# Allegro board A733_PRO3_AXP318_LPDDR5_FBGA315BALL_32X1_V2_0.brd
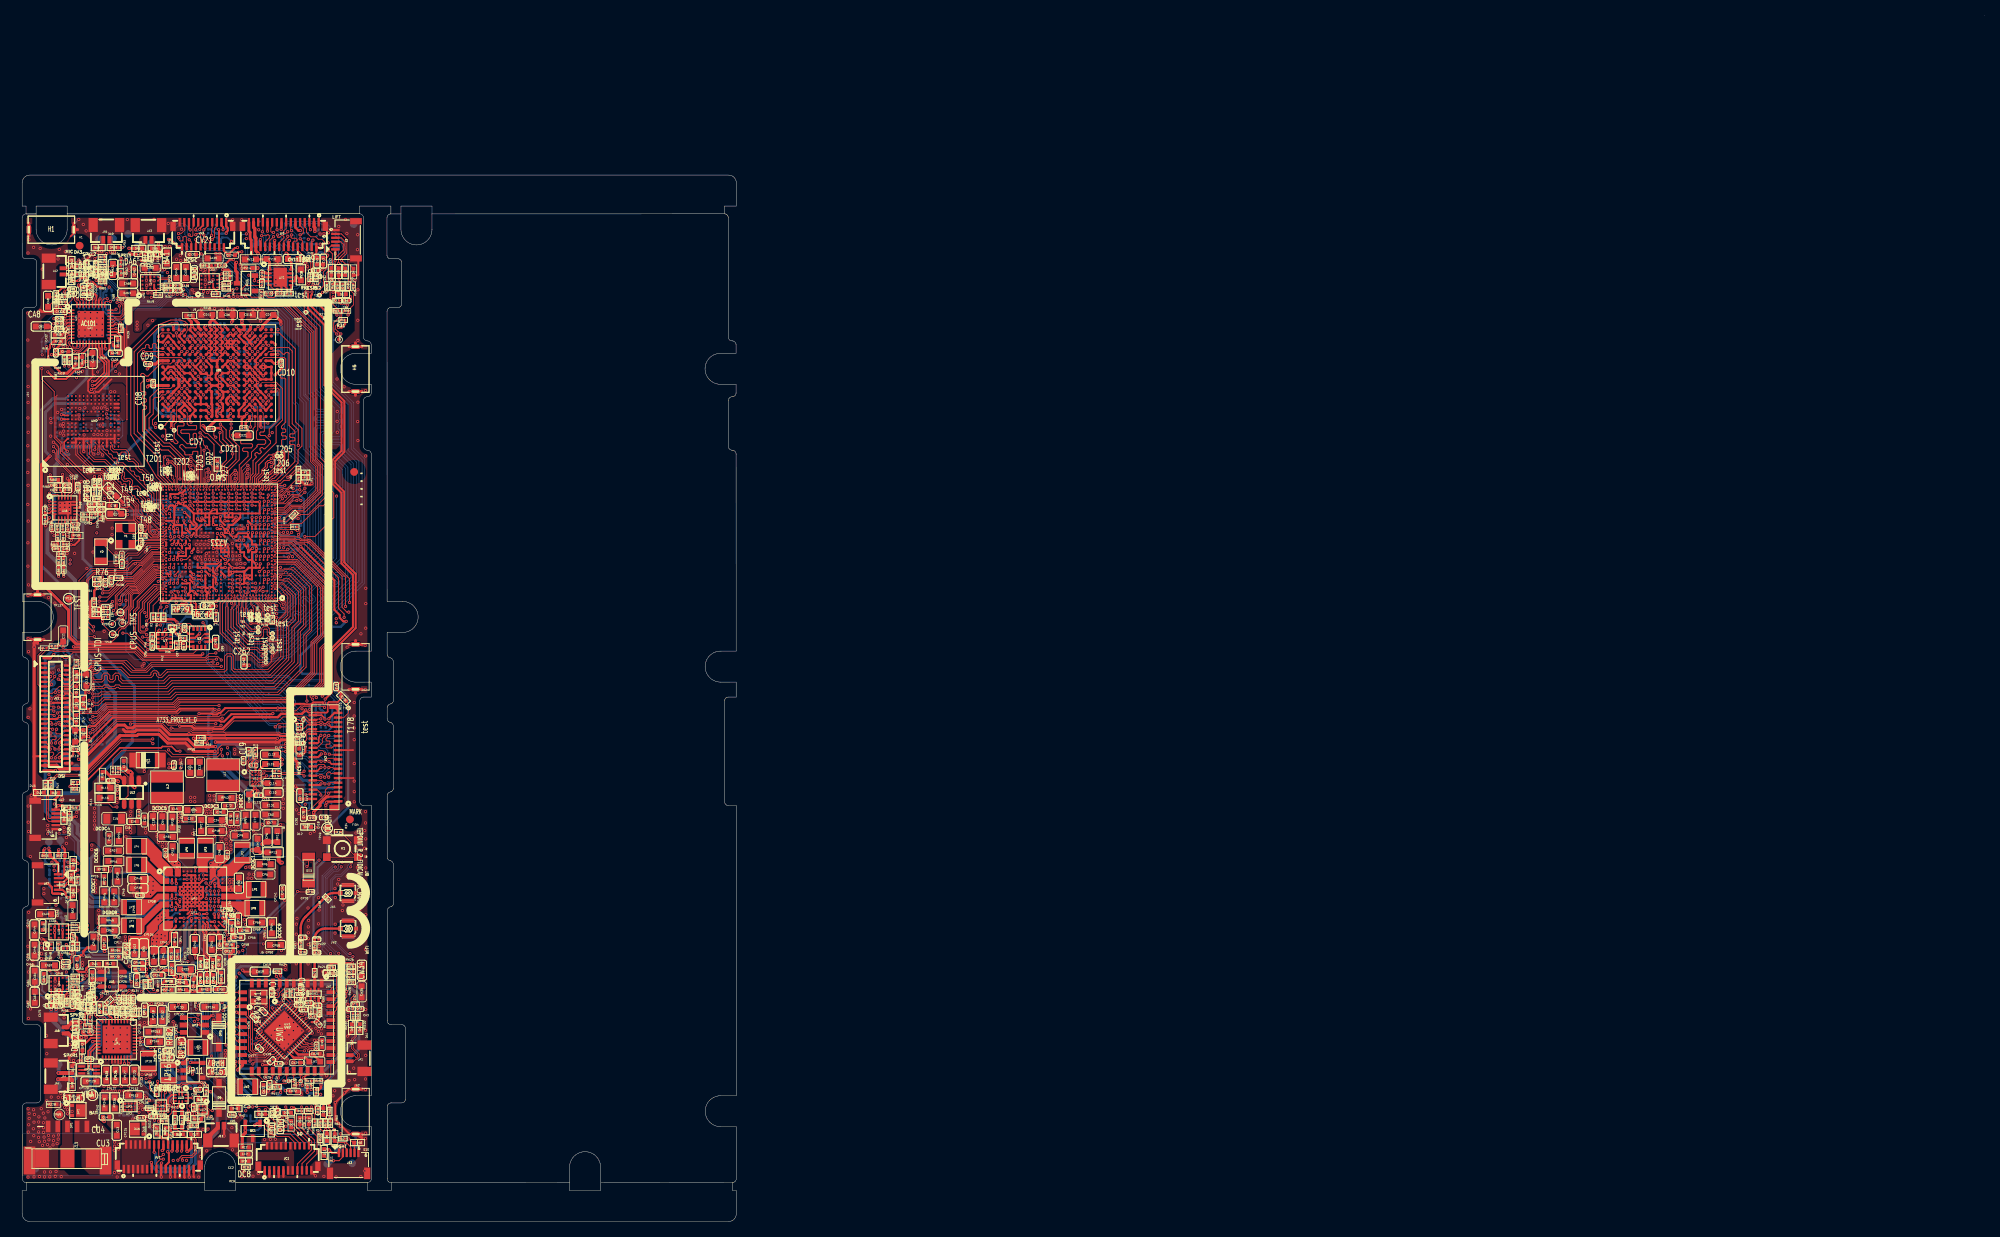
[diagram p0: board, top side]
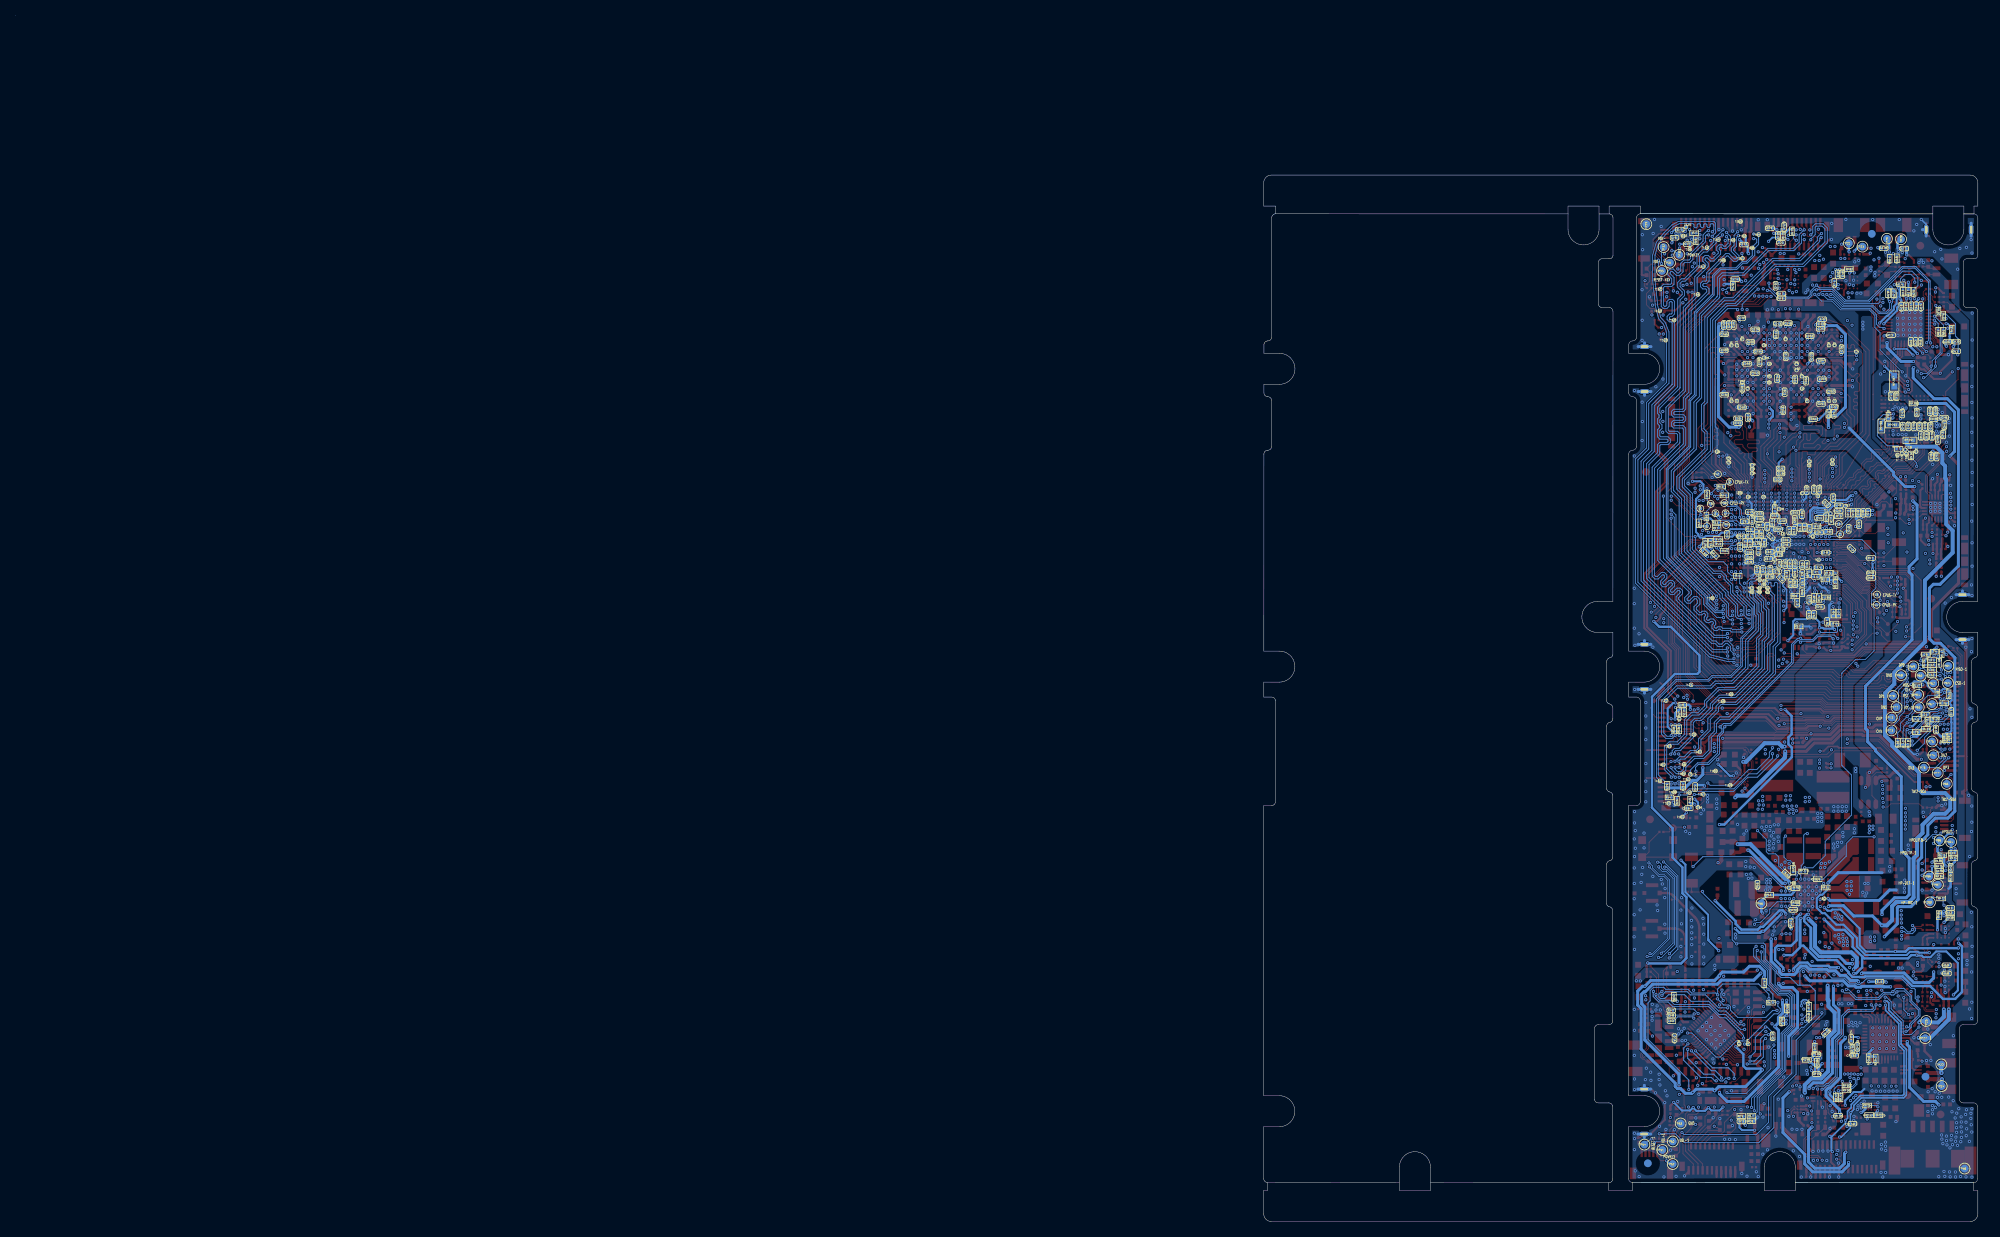
[diagram p1: board, bottom side, seen from below]

Outline 253 x 155.6 mm; copper layers: TOP, L2GND, L3, L4, L5GND, BOTTOM. Coordinates in mm from the lower left corner of the outline.
Outline path: 253,155.6 253,155.59 ; 0,129.5 arc(0.15,129.85) 0.5,130 1.8,130 1.8,128 arc(3.8,126) 5.8,128 5.8,130 43.5,130.01 arc(43.85,129.87) 44,129.51 44.01,114.11 arc(44.15,113.76) 44.51,113.61 arc(44.86,113.47) 45.01,113.11 45.01,112.01 43.01,112.01 arc(41.01,110.01) 43.01,108.01 45.01,108.01 45.01,106.91 arc(44.86,106.56) 44.51,106.41 arc(44.15,106.27) 44.01,105.91 44.01,100.01 arc(44.16,99.66) 44.51,99.51 arc(44.86,99.37) 45.01,99.01 45.02,73.59 43.02,73.59 arc(41.02,71.59) 43.02,69.59 45.02,69.59 45.02,67.66 44.02,67.66 arc(43.67,67.52) 43.52,67.16 43.52,54.16 arc(43.67,53.81) 44.02,53.66 45.02,53.66 45.04,16.34 45.04,16.23 43,16.23 arc(41.03,14.22) 43.02,12.23 45.04,12.23 45.04,5.52 arc(44.89,5.18) 44.55,5.03 44.53,5.03 27.54,5.05 27.54,7.07 arc(25.54,9.01) 23.54,7.07 23.54,7.01 23.54,5.01 0.54,5 arc(0.19,5.15) 0.04,5.5 0.04,14.8 arc(0.18,15.15) 0.54,15.3 1.89,15.3 arc(2.24,15.45) 2.39,15.8 2.38,24.9 arc(2.24,25.25) 1.88,25.4 0.53,25.4 arc(0.18,25.55) 0.03,25.9 0.03,40 arc(0.12,40.37) 0.43,40.6 arc(0.7,40.73) 0.83,41 0.83,46 arc(0.73,46.35) 0.43,46.56 arc(0.15,46.71) 0.03,47 0.02,54.93 arc(0.14,55.25) 0.42,55.42 arc(0.71,55.59) 0.82,55.91 0.82,63.91 arc(0.71,64.23) 0.42,64.4 arc(0.13,64.57) 0.02,64.89 0.02,66.29 arc(0.15,66.59) 0.42,66.77 arc(0.69,66.9) 0.82,67.17 0.82,72.17 arc(0.72,72.53) 0.42,72.73 arc(0.14,72.88) 0.02,73.17 0.02,76 2.02,76 arc(4.02,78) 2.02,80 0.02,80 0,117.44 arc(0.13,117.75) 0.4,117.93 1.47,117.93 arc(1.75,118.06) 1.87,118.33 1.87,123.81 arc(1.74,124.08) 1.47,124.21 0.54,124.21 arc(0.17,124.31) 0,124.65 0,129.5

## Design rules (mm)
net group AECR: nets AECRN AECRP
net group DP2: nets MIC1N-MIC MIC1P-MIC
net group DP3: nets MIC2N/MIC3N MIC2P/MIC3P
net group DP4: nets MIC2N/MIC3N-1 MIC2P/MIC3P-1
net group DP5: nets MIC2N/MIC3N-MIC MIC2P/MIC3P-MIC
net group DP6: nets N20760136 N20760138
net group HPOUTL-2: nets HPOUTL-2 SWOUT2
net group HPOUTR-2: nets HPOUTR-2 USB2-SW-EN
net group IIC-TW0: nets TWI0-SCK TWI0-SDA
net group MCSI-IIC: nets TWI3-SCK TWI3-SDA
net group MICIN1: nets MICIN1N MICIN1P
net group PWU-IIC: nets PMU-SCK PMU-SDA
net group SDC0-CLK: nets N22008209 SDC0-CLK
net group SPOL: nets SPOLN SPOLP
net group SPOR: nets SPORN SPORP
net group TW1-IIC: nets TWI1-SCK TWI1-SDA
net group USB1-DM: nets N16846076 USB1-DM
net group USB1-DP: nets N16846079 USB1-DP
net group WCK0-A: nets WCK0N-A WCK0P-A
net group WCK0-B: nets WCK0N-B WCK0P-B
net group WCK1-A: nets WCK1N-A WCK1P-A
net group WCK1-B: nets WCK1N-B WCK1P-B
net group WL-SDIO-CLK: nets N21687669 WL-SDIO-CLK
net group CLS-CLK: nets AP-CK32K-OUT
net group D+: nets D+ N21860949 TYPEC-DP TYPEC-DP-1 USB0-DP USB2-DP
net group D-: nets D- N21860967 TYPEC-DM TYPEC-DM-1 USB0-DM USB2-DM
net group LDO: nets ALDO2 ALDO3 BLDO2 BLDO4 CLDO1 CLDO2

## Placement (name value [footprint] x y rotation side)
BA1  600R@100M  [L0603]  18.66 124.31 90 top
BA2  600R@100M  [L0603]  6.5 40.11 90 top
C1  2.2uF  [C0201]  20.72 83.79 0 bottom
C3  2.2uF  [C0201]  20.89 83.18 0 bottom
C4  470nF  [C0201]  20.47 84.4 0 bottom
C5  100nF  [C0201]  14.14 91.45 270 bottom
C6  100nF  [C0201]  22.63 82.41 90 bottom
C7  100nF  [C0201]  23.29 79.84 90 bottom
C8  NC/100nF  [C0201]  22.63 83.52 270 bottom
C9  100nF  [C0201]  30.07 90.33 0 bottom
C10  100nF  [C0201]  17.93 92.38 180 bottom
C11  10uF  [C0603]  5.29 75.55 90 top
C12  100nF  [C0201]  29.99 87.54 90 bottom
C13  100nF  [C0201]  29.38 87.54 90 bottom
C14  100nF  [C0201]  27.71 84.08 270 bottom
C15  100nF  [C0201]  29.38 88.39 180 bottom
C16  1uF  [C0201]  29.37 89.33 180 bottom
C17  100nF  [C0201]  32.35 88.62 270 bottom
C18  100nF  [C0201]  26.75 84.09 270 bottom
C19  100nF  [C0201]  28.48 84.09 270 bottom
C20  100nF  [C0201]  10.73 82.42 270 top
C21  100nF  [C0201]  15.31 89.96 90 bottom
C22  2.2uF  [C0201]  21.73 80.23 90 bottom
C23  100nF  [C0201]  20.35 79.3 180 bottom
C24  22uF  [C0603]  25.04 51.78 0 top
C25  22uF  [C0603]  22.03 53.07 180 top
C26  10uF  [C0402]  25.56 52.83 0 top
C27  4.7uF  [C0402]  21.53 51.95 180 top
C28  2.2uF  [C0201]  25.71 86.08 0 bottom
C29  2.2uF  [C0201]  25.61 84.86 270 bottom
C30  1uF  [C0201]  24.82 84.81 270 bottom
C31  1uF  [C0201]  24.21 84.81 270 bottom
C32  100nF  [C0201]  23.61 84.81 270 bottom
C33  2.2uF  [C0201]  25.45 86.71 0 bottom
C34  10uF  [C0402]  15.76 51.8 270 top
C35  2.2uF  [C0201]  24.74 87.93 0 bottom
C36  1uF  [C0201]  22.05 84.72 270 bottom
C37  1nF  [C0201]  11.5 82.78 90 top
C38  100nF  [C0201]  14.76 91.44 270 bottom
C39  100nF  [C0201]  20.49 88.91 180 bottom
C40  1uF  [C0201]  16.66 89.37 90 bottom
C41  1uF  [C0201]  21.7 89.39 90 bottom
C42  4.7uF  [C0402]  11.2 49.43 270 top
C43  2.2uF  [C0201]  22.33 89.56 90 bottom
C44  100nF  [C0201]  22.94 89.56 90 bottom
C45  4.7uF  [C0402]  19.83 53.25 0 top
C46  1uF  [C0201]  24.74 87.32 0 bottom
C47  2.2uF  [C0201]  16.31 86.84 45 bottom
C48  1nF  [C0201]  19.61 86.31 0 bottom
C49  100nF  [C0201]  29.41 91.54 180 bottom
C50  1uF  [C0201]  15.4 91.45 270 bottom
C51  100nF  [C0201]  9.61 82.22 0 top
C52  100nF  [C0201]  24.32 89.14 90 bottom
C53  2.2uF  [C0201]  23.71 89.14 90 bottom
C54  22uF  [C0603]  18.09 51.58 270 top
C55  2.2uF  [C0201]  22.66 84.71 270 bottom
C56  10uF  [C0603]  29.24 54.39 90 top
C57  4.7uF  [C0402]  32.09 51.46 0 top
C58  2.2uF  [C0201]  27.91 88.68 90 bottom
C59  1uF  [C0201]  29.47 85.14 0 bottom
C60  100nF  [C0201]  29.47 85.75 0 bottom
C61  18pF-C0G  [C0201]  15.28 87.59 270 top
C62  22pF-C0G  [C0201]  12.85 85.95 90 top
C63  22uF  [C0603]  32.05 52.51 0 top
C64  10uF  [C0402]  27.71 51.99 270 top
C65  2.2uF  [C0201]  26.82 86.41 180 bottom
C66  1uF  [C0201]  29.47 86.36 0 bottom
C67  100nF  [C0201]  26.99 85.48 180 bottom
C68  1uF  [C0201]  27.56 87.58 90 bottom
C69  18pF-C0G  [C0201]  15.28 89.41 90 top
C70  22pF-C0G  [C0201]  12.85 84.82 270 top
C71  10uF  [C0603]  30.08 51.78 270 top
C72  10uF  [C0402]  26.58 53.64 180 top
C73  4.7uF  [C0402]  26.89 52 270 top
C74  1uF  [C0201]  26.67 88.35 225 bottom
C75  100nF  [C0201]  28.52 88.68 90 bottom
C76  100nF  [C0201]  25.89 83.87 0 bottom
C77  22uF  [C0603]  12.07 91.31 180 top
C78  10uF  [C0402]  11.68 92.35 180 top
C79  1uF  [C0201]  27.15 89.66 90 bottom
C80  1uF  [C0201]  23.6 90.5 270 bottom
C81  100nF  [C0201]  22.69 91.26 90 bottom
C82  100nF  [C0201]  28.05 89.86 180 bottom
C83  2.2uF  [C0201]  25.76 89.3 0 bottom
C84  NC  [C0201]  10.75 79.27 180 top
C85  NC  [C0201]  9.55 78.97 0 top
C86  1nF  [C0201]  41.84 118.81 0 top
C87  10nF  [C0201]  20.87 74.29 90 top
C88  100nF  [C0201]  20.93 76.58 90 top
C89  2.2uF  [C0402]  24.95 74.75 270 top
C92  1uF  [C0201]  21.13 78.28 90 bottom
C93  100nF  [C0201]  21.79 78.28 90 bottom
C95  47pF  [C0201]  27.03 13.76 180 top
C96  100nF  [C0201]  16.79 74.26 90 top
C97  100nF  [C0201]  19.43 77.38 90 bottom
C108  NC/100nF  [C0201]  23.54 82.35 270 bottom
C109  100nF  [C0201]  23.6 83.69 90 bottom
C110  1nF  [C0201]  38.12 14.35 90 top
C111  NC/1uF  [C0201]  28.28 86.54 90 bottom
C116  NC/1uF  [C0201]  26.84 83.23 0 bottom
C125  NC/100nF  [C0201]  17.93 91.7 180 bottom
C128  NC/100nF  [C0201]  24.15 82.35 270 bottom
C129  NC/100nF  [C0201]  28.53 87.39 0 bottom
C130  22uF  [C0603]  16.87 51.6 270 top
C131  22uF  [C0603]  32.05 53.72 0 top
C132  100nF  [C0201]  30.65 87.02 270 bottom
C133  100nF  [C0201]  29.12 90.54 90 bottom
C134  1uF  [C0201]  19.57 58.9 90 top
C135  1uF  [C0201]  11.44 56.88 180 top
C257  1uF  [C0201]  13.77 85.61 180 bottom
C258  1uF  [C0201]  13.76 83.03 180 bottom
C259  2.2uF  [C0201]  13.76 83.64 0 bottom
C260  100nF  [C0201]  30.49 88.39 0 bottom
C261  4.7uF  [C0402]  23.9 79.44 180 top
C262  10uF  [C0402]  28.6 72.2 90 top
CA1  10uF/2.2uF  [C0603]  2.46 115.48 0 top
CA2  1uF/NC  [C0201]  8.01 113.5 90 bottom
CA3  33pF  [C0201]  43.51 27.42 180 top
CA4  4.7uF/NC  [C0402]  5.55 112.24 0 top
CA5  1uF  [C0201]  7.95 118.09 90 bottom
CA6  100nF/1uF  [C0201]  6.44 120.3 180 top
CA7  10pF  [C0201]  42.95 28.04 180 top
CA8  10uF/NC  [C0603]  3.34 118.73 270 top
CA9  100nF/1uF  [C0201]  6.44 119.69 180 top
CA10  2.2uF/1uF  [C0201]  8.65 113.52 90 bottom
CA11  2.2uF/NC  [C0201]  9.25 118.07 270 bottom
CA12  33pF  [C0201]  42.4 27.42 180 top
CA13  NC/2.2uF  [C0201]  11.19 114.36 180 bottom
CA14  1uF/0.47uF  [C0201]  4.34 112.09 270 top
CA15  1uF/NC  [C0201]  7.33 118.11 90 bottom
CA16  33pF  [C0201]  8.24 123.47 270 top
CA17  1uF/0.1uF  [C0201]  8.59 118.09 270 bottom
CA18  1uF  [C0201]  9.87 118.07 90 bottom
CA19  100nF/1uF  [C0201]  9.47 123.43 270 top
CA20  10pF  [C0201]  8.86 122.64 270 top
CA21  10uF  [C0603]  11.7 122.86 270 top
CA22  100nF/1uF  [C0201]  9.47 122.32 90 top
CA23  2.2uF  [C0402]  8.76 120.15 90 top
CA24  33pF  [C0201]  8.24 121.96 270 top
CA25  10uF  [C0603]  9.08 111.35 270 top
CA26  2.2uF  [C0402]  12.01 112.03 180 top
CA27  2.2uF  [C0402]  4.9 117.41 180 top
CA28  100nF/1uF  [C0201]  4.81 116.49 180 top
CA29  100nF  [C0201]  4.99 45.22 0 bottom
CA30  33pF  [C0201]  2.78 113.52 0 bottom
CA31  100nF  [C0201]  3.5 45.63 270 bottom
CA32  100nF/1uF  [C0201]  4.8 115.85 180 top
CA33  NC/33pF  [C0201]  3.89 113.52 0 bottom
CA34  NC/33pF  [C0201]  2.79 112.28 0 bottom
CA35  22uF  [C0603]  24.62 124.27 180 top
CA36  100nF  [C0201]  25.79 123.35 0 top
CA37  NC/100nF  [C0201]  24.67 123.35 180 top
CA38  4.7uF-10V  [C0402]  22.21 122.41 90 top
CA39  10uF-25V  [C0603]  21.11 122.44 270 top
CA40  22uF  [C0603]  3.02 39.65 180 top
CA41  100nF  [C0201]  3.54 40.46 180 bottom
CA42  NC/100nF  [C0201]  3.54 39.85 180 bottom
CA43  4.7uF-10V  [C0402]  2.66 38.05 270 top
CA44  10uF-25V  [C0603]  1.59 37.63 90 top
CA45  10uF-25V  [C0603]  19.88 122.44 270 top
CA46  10uF-25V  [C0603]  1.59 35.01 90 top
CA47  330nF  [C0201]  25.32 119.72 180 bottom
CA48  330nF  [C0201]  5.64 32.88 180 top
CA49  330nF  [C0201]  25.32 119.11 180 bottom
CA50  330nF  [C0201]  5.64 33.49 180 top
CA51  NC/220pF  [C0201]  26.08 120.72 90 bottom
CA52  NC/220pF  [C0201]  6.54 36.71 90 top
CA53  NC/100pF  [C0201]  14.98 124.8 180 top
CA54  NC/100pF  [C0201]  17.47 124.77 0 top
CA55  NC/100pF  [C0201]  3.07 35.51 90 top
CA56  NC/100pF  [C0201]  5.57 35.24 0 top
CA57  22uF  [C0603]  3.53 33.04 180 top
CA58  100nF  [C0201]  3.98 32 180 bottom
CA59  NC/100nF  [C0201]  4 33.06 180 bottom
CA60  22uF  [C0603]  16.51 123.05 180 top
CA61  100nF  [C0201]  18.08 122.23 270 bottom
CA62  4.7uF-10V  [C0402]  14.46 122.53 270 top
CA63  10uF-25V  [C0603]  13.63 119.76 180 top
CA64  10uF-25V  [C0603]  1.62 31.65 90 top
CA65  NC/100nF  [C0201]  17.48 122.23 270 bottom
CA66  4.7uF-10V  [C0402]  2.8 31.53 90 top
CA67  10uF-25V  [C0603]  1.62 28.93 90 top
CA68  10uF-25V  [C0603]  13.6 121.03 0 top
CA69  330nF  [C0201]  7.16 28.05 270 top
CA70  330nF  [C0201]  20.06 120.76 0 top
CA71  330nF  [C0201]  6.51 28.05 270 top
CA72  330nF  [C0201]  20.06 120.13 0 top
CA73  NC/220pF  [C0201]  6.82 30.23 0 top
CA74  NC/220pF  [C0201]  18.51 121.12 90 bottom
CA75  NC/100pF  [C0201]  3.5 27.84 180 top
CA76  NC/100pF  [C0201]  4.64 27.84 0 top
CA77  NC/100pF  [C0201]  9.48 125.53 180 bottom
CA78  NC/100pF  [C0201]  12.14 125.56 0 bottom
CA79  1uF  [C0201]  4.65 94.37 180 top
CA80  100nF  [C0201]  4.65 94.98 180 top
CA81  1uF  [C0201]  6.82 89.26 0 top
CA82  100nF  [C0201]  5.8 94.98 0 top
CA83  10nF  [C0201]  5.54 86.76 180 top
CA84  470nF  [C0201]  5.28 88.35 90 top
CA85  1uF  [C0201]  5.36 84.1 90 top
CA86  NC  [C0201]  4.99 86.13 180 top
CA87  470nF  [C0201]  4.59 88.36 90 top
CA88  1uF  [C0201]  4.7 84.08 90 top
CA89  10nF  [C0201]  4.43 86.76 180 top
CA90  100nF  [C0201]  2.93 91.74 90 top
CA91  NC/1uF  [C0201]  3.86 89.56 270 top
CA92  NC/1uF  [C0201]  7.16 94.83 90 top
CA93  10nF  [C0201]  10.22 91.86 180 top
CA94  470nF  [C0201]  10.08 90.96 270 top
CA95  1uF  [C0201]  9.96 95.3 270 top
CA96  NC  [C0201]  9.61 93.21 180 top
CA97  470nF  [C0201]  9.21 91.21 180 top
CA98  1uF  [C0201]  9.31 95.31 270 top
CA99  10nF  [C0201]  9.01 91.85 180 top
CA100  1uF  [C0201]  5.91 89.53 270 top
CA101  1uF  [C0201]  5.8 94.37 0 top
CA102  100nF  [C0201]  6.82 89.92 0 top
CC1  100nF  [C0201]  30.48 12.91 180 bottom
CC2  10uF  [C0402]  28.77 8.7 180 top
CD1  10uF  [C0603]  31.69 116.98 180 top
CD2  100nF  [C0201]  20.06 116.41 0 bottom
CD3  100nF  [C0201]  30.91 103.02 0 bottom
CD4  100nF  [C0201]  18.59 104.2 90 bottom
CD5  100nF  [C0201]  30.91 103.62 0 bottom
CD6  10uF  [C0603]  26.44 116.99 180 top
CD7  4.7uF  [C0201]  24.33 102.25 0 top
CD8  2.2uF  [C0201]  16.9 108.11 90 top
CD9  100nF  [C0201]  16.23 110.64 180 top
CD10  100nF  [C0201]  33.41 110.73 270 top
CD11  10uF  [C0603]  23.81 117 180 top
CD12  4.7uF  [C0201]  23.55 108.64 90 bottom
CD13  2.2uF  [C0201]  25.8 115.85 0 bottom
CD14  100nF  [C0201]  26.05 114.47 270 bottom
CD15  100nF  [C0201]  24.78 111.63 90 bottom
CD16  10uF  [C0603]  29.05 116.99 0 top
CD17  4.7uF  [C0201]  29.64 103.74 270 bottom
CD18  2.2uF  [C0201]  21.47 111.54 270 bottom
CD19  100nF  [C0201]  28.71 115.1 0 bottom
CD20  100nF  [C0201]  18.58 105.09 180 bottom
CD21  10uF  [C0603]  28.5 101.42 0 top
CD22  4.7uF  [C0201]  25.8 95.74 180 bottom
CD23  2.2uF  [C0201]  28.19 90.63 0 bottom
CD24  100nF  [C0201]  26.54 90.17 270 bottom
CD25  100nF  [C0201]  28.2 91.31 0 bottom
CD26  1uF  [C0201]  26.18 91.93 90 bottom
CD27  100nF  [C0201]  26.17 91.03 0 bottom
CD32  10uF  [C0603]  11.58 94.11 135 top
CD33  4.7uF  [C0201]  21.14 94.41 270 bottom
CD34  2.2uF  [C0201]  25.24 90.37 0 bottom
CD35  100nF  [C0201]  22.07 94.36 270 bottom
CD36  100nF  [C0201]  25.43 96.51 0 bottom
CD37  100nF  [C0201]  19.27 104.2 90 bottom
CD38  100nF  [C0201]  32.73 115.67 270 bottom
CD39  100nF  [C0201]  20.27 115.78 0 bottom
CD40  100nF  [C0201]  32.09 115.67 270 bottom
CD41  100nF  [C0201]  20.27 115.18 0 bottom
CD42  100nF  [C0201]  31.48 115.67 270 bottom
CD43  100nF  [C0201]  28.73 109.44 0 bottom
CD44  100nF  [C0201]  20.24 111.05 180 bottom
CD45  100nF  [C0201]  20.1 108.68 180 bottom
CD46  100nF  [C0201]  25.08 104.69 90 bottom
CD47  100nF  [C0201]  25.89 108.77 90 bottom
CD48  100nF  [C0201]  24.49 115.92 0 bottom
CD49  100nF  [C0201]  28.57 102.41 0 top
CD50  100nF  [C0201]  29.33 113.5 0 bottom
CD51  100nF  [C0201]  20.22 105.48 0 bottom
CD52  100nF  [C0201]  30.42 105.04 180 bottom
CD53  100nF  [C0201]  21.67 114.24 0 bottom
CD54  100nF  [C0201]  28.34 112.25 180 bottom
CD55  1uF  [C0201]  23.56 91.45 180 bottom
CD56  1uF  [C0201]  20.43 94.41 270 bottom
CD57  1uF  [C0201]  25.43 97.16 0 bottom
CD58  2.2uF  [C0201]  30.36 107.57 90 bottom
CD59  1uF  [C0201]  30.48 116.58 0 bottom
CD60  1uF  [C0201]  32.75 112.39 0 bottom
CD61  1uF  [C0201]  32.7 106.67 0 bottom
CD62  1uF  [C0201]  17.57 112.55 270 bottom
CD63  2.2uF  [C0201]  18.93 107.1 0 bottom
CD64  100nF  [C0201]  21.25 103.52 180 bottom
CD65  100nF  [C0201]  32.71 114.47 0 bottom
CD66  1uF  [C0201]  22.14 108.49 270 bottom
CD67  1uF  [C0201]  24.91 107.01 270 bottom
CD68  1uF  [C0201]  28.15 110.9 270 bottom
CD69  1uF  [C0201]  29.76 110.66 0 bottom
CL1  1nF  [C0201]  15.03 52.6 90 top
CL3  10uF  [C0603]  22.91 58.61 270 top
CL4  10uF  [C0603]  21.67 58.6 270 top
CL5  4.7uF-50V  [C0805]  11.87 51.97 0 top
CL6  100nF-50V  [C0402]  14.42 51.62 180 top
CL7  100nF-50V  [C0402]  13.11 59.02 90 top
CL9  100nF  [C0201]  28.54 59.46 270 top
CL10  10uF-10V  [C0603]  32.35 55.33 180 top
CL11  100nF-10V  [C0201]  30.47 54.99 0 top
CL12  10uF-10V  [C0603]  32.04 60.24 180 top
CL13  100nF-10V  [C0201]  29.84 58.84 0 top
CL14  10uF-10V  [C0603]  32.33 56.55 0 top
CL15  4.7uF-10V  [C0603]  32.04 59.03 0 top
CL16  NC  [C0201]  5.4 63.47 270 bottom
CL17  100nF  [C0201]  3.42 65.76 270 bottom
CL18  10uF  [C0603]  8.28 69.86 270 top
CL19  100nF  [C0201]  6.84 60.95 0 top
CL20  10uF  [C0603]  6.84 62.62 270 top
CM1  100nF  [C0201]  18.66 93.34 90 bottom
CM2  4.7uF  [C0201]  19.53 92.63 45 bottom
CM3  100nF  [C0201]  19.56 90.87 270 bottom
CM4  4.7uF  [C0201]  20.47 90.78 180 bottom
CM24  2.2uF  [C0201]  7.35 101.36 90 bottom
CM25  1uF  [C0201]  9.74 104.24 90 bottom
CM26  4.7uF  [C0201]  10.48 106.48 270 bottom
CM27  4.7uF  [C0201]  11.2 106.46 270 bottom
CM28  100nF  [C0201]  7.88 104.38 90 bottom
CM29  4.7uF  [C0201]  5.92 101.36 90 bottom
CM30  100nF  [C0201]  4.47 101.55 270 bottom
CM31  100nF  [C0201]  6.63 101.36 90 bottom
CM32  4.7uF  [C0201]  8.95 102.57 270 bottom
CM33  100nF  [C0201]  6.81 102.57 270 bottom
CM34  100nF  [C0201]  7.52 102.57 270 bottom
CM35  2.2uF  [C0201]  6.18 104.54 90 bottom
CM37  2.2uF  [C0201]  5.31 98.69 270 bottom
CM39  2.2uF  [C0201]  5.7 103.52 0 bottom
CM54  4.7uF  [C0201]  9.68 102.57 270 bottom
CM55  2.2uF  [C0201]  6.1 102.56 270 bottom
CM56  1uF  [C0201]  8.23 102.57 270 bottom
CM57  4.7uF  [C0201]  4.31 102.75 90 bottom
CM58  1uF  [C0201]  5.15 100.83 270 bottom
CM59  100nF  [C0201]  5.46 104.54 90 bottom
CM60  100nF  [C0201]  6.02 98.68 270 bottom
CM61  100nF  [C0201]  4.35 103.71 180 bottom
CP1  10uF  [C0603]  15.69 35.19 90 top
CP2  4.7uF  [C0402]  27.87 38.89 90 top
CP3  22uF  [C0603]  27.95 43.66 90 top
CP4  10uF  [C0603]  16.98 34.22 90 top
CP5  22uF  [C0603]  31.3 44.78 0 top
CP6  10uF  [C0603]  31.62 49.71 270 top
CP7  10uF  [C0603]  30.36 48.67 270 top
CP8  22uF  [C0603]  25.46 47.61 90 top
CP9  22uF  [C0603]  28.12 49.81 0 top
CP10  100nF  [C0201]  37.17 42.52 180 top
CP11  10uF  [C0603]  9.19 36.05 270 top
CP12  4.7uF  [C0402]  7.07 33.42 90 top
CP13  4.7uF  [C0402]  19.22 34.46 90 top
CP15  1uF  [C0201]  26.44 47.32 90 top
CP17  4.7uF  [C0402]  10.58 35.97 270 top
CP18  22uF  [C0603]  25.03 50.39 180 top
CP20  1uF  [C0201]  23.81 40.21 0 bottom
CP21  1uF  [C0201]  24.12 38.5 90 bottom
CP22  10uF  [C0603]  21.05 32.54 0 top
CP23  22uF  [C0603]  19.41 47.71 90 top
CP24  4.7uF  [C0402]  17.51 31.78 0 top
CP25  4.7uF  [C0402]  14.77 31.07 90 top
CP27  22uF  [C0603]  11.77 47.84 0 top
CP28  4.7uF  [C0402]  25.38 33.51 90 top
CP29  4.7uF  [C0402]  22.99 31.34 90 top
CP30  1uF  [C0201]  18.47 47.57 90 top
CP31  10uF  [C0603]  24.44 35.76 90 top
CP32  4.7uF  [C0402]  26.77 34.88 0 top
CP33  4.7uF  [C0402]  23.83 31.34 90 top
CP34  22uF  [C0603]  18.72 49.63 0 top
CP35  4.7uF  [C0402]  24.65 31.34 90 top
CP37  4.7uF  [C0402]  25.54 29.93 180 top
CP38  22uF  [C0603]  14.93 42.99 180 top
CP39  22uF  [C0603]  12.29 44.56 90 top
CP40  10uF  [C0603]  22.26 35.74 90 top
CP41  10uF  [C0603]  18.21 34.21 90 top
CP43  1uF  [C0201]  15.17 42.06 180 top
CP44  4.7uF  [C0402]  20.03 34.46 90 top
CP46  4.7uF  [C0402]  15.03 33.4 0 top
CP47  22uF  [C0603]  11.88 41.9 270 top
CP48  NC  [C0402]  22.1 30.78 90 top
CP49  NC/10uF  [C0603]  14.92 44.19 180 top
CP50  10uF  [C0603]  32.66 35.68 180 top
CP51  NC  [C0402]  25.47 36.16 90 top
CP52  22uF  [C0603]  11.21 37.54 0 top
CP55  4.7uF  [C0402]  28.65 37.59 180 top
CP56  1uF  [C0201]  28.42 43.46 90 bottom
CP58  4.7uF  [C0402]  27.81 36.69 180 top
CP59  22uF  [C0603]  30.23 38.59 0 top
CP103  10uF  [C0603]  14.49 35.2 90 top
CP112  10uF  [C0603]  14.36 16.27 0 top
CP115  100nF  [C0201]  15.34 13.38 0 top
CP116  100nF  [C0201]  8.56 27.73 270 top
CP117  1uF-15V  [C0402]  15.81 27.29 270 top
CP118  10uF-15V  [C0603]  16.86 26.57 270 top
CP119  10uF  [C0603]  6.67 16.04 180 top
CP120  10uF  [C0603]  8.88 18.06 180 top
CP121  1uF  [C0201]  8.65 20.94 0 top
CP122  10uF  [C0603]  10.83 18.87 270 top
CP123  NC/22uF  [C0603]  14.46 18.88 90 top
CP124  4.7uF  [C0201]  16.33 23.56 90 bottom
CP125  47nF-25V  [C0201]  15.54 22.54 90 bottom
CP126  22uF  [C0603]  12.04 18.87 90 top
CP127  NC/22uF  [C0603]  13.25 18.88 90 top
CP129  4.7uF  [C0402]  8.24 24.43 0 top
CP130  NC/100pF  [C0201]  15.93 21.41 180 bottom
CP132  NC/10uF-15V  [C0603]  18.07 26.58 270 top
CP133  NC/10uF-15V  [C0603]  20.15 27.68 180 top
CP134  22uF  [C0603]  24.21 27.7 0 top
CP135  100nF  [C0201]  18.01 13.65 180 bottom
CP136  22uF  [C0603]  20.44 22.43 270 top
CP137  1uF  [C0201]  10.8 27.28 270 top
CP138  330pF  [C0201]  16.86 13.56 0 top
CP139  330pF  [C0201]  16.16 12.63 0 bottom
CP140  4.7uF  [C0402]  20.71 30.8 180 top
CP141  4.7uF  [C0402]  33.56 42.52 270 top
CP142  1uF  [C0201]  15.07 26.98 90 top
CP143  1uF  [C0201]  14.46 26.99 90 top
CP144  22uF  [C0603]  17.09 23.19 180 top
CP150  NC/100nF  [C0201]  20.79 21.57 0 bottom
CP151  10uF  [C0603]  25.08 19.27 0 top
CP152  22pF  [C0201]  20.81 19.02 180 bottom
CP153  10uF  [C0402]  18.71 21.23 180 top
CP154  2.2uF  [C0201]  18.71 22.04 180 top
CU1  1uF  [C0201]  12.66 30.95 180 bottom
CU2  4.7uF  [C0402]  9.03 31.75 90 top
CU3  10uF-16V  [C0603]  12.2 11.77 270 top
CU4  1uF  [C0402]  10.83 13.5 180 top
CU5  100nF  [C0201]  22.69 17 180 top
CU6  100nF  [C0201]  22.14 14.71 90 top
CV1  NC  [C0201]  37.85 122.69 0 top
CV2  NC  [C0402]  38.82 123.91 270 top
CV3  NC  [C0201]  36.46 56.07 90 bottom
CV4  2.2uF  [C0201]  37.4 126.1 0 bottom
CV5  4.7uF  [C0402]  38.01 123.9 270 top
CV6  1uF  [C0201]  39.11 126.93 0 bottom
CV7  1uF  [C0201]  38.44 127.98 0 bottom
CV8  1uF  [C0201]  38.11 66.66 180 bottom
CV9  100nF  [C0201]  40.47 69.02 270 top
CV10  10uF  [C0603]  32.23 124.18 0 top
CV11  4.7uF-16V  [C0603]  34.98 124.19 0 top
CV12  1uF  [C0201]  30.91 122.2 270 top
CV13  100nF  [C0201]  30.17 126.05 0 bottom
CV14  NC/1uF  [C0201]  31.29 121.58 0 bottom
CV15  100nF  [C0201]  31.76 119.73 0 top
CV16  2.2uF  [C0201]  37.27 53.33 0 bottom
CV17  4.7uF  [C0402]  35.81 54.94 90 top
CV18  1uF  [C0201]  38.87 52.13 180 top
CV19  1uF  [C0201]  37.35 52.06 180 top
CV20  NC  [C0402]  36.29 52.55 270 top
CV21  NC  [C0402]  21.99 124.76 180 top
CV22  NC  [C0201]  25.38 126.28 0 bottom
CV23  2.2uF  [C0201]  24.97 128.33 90 bottom
CV24  4.7uF  [C0402]  27.02 124.67 0 top
CV25  1uF  [C0201]  25.8 127.2 270 bottom
CV26  1uF  [C0201]  26.79 128.14 0 bottom
CW1  NC  [C0201]  37.46 26.47 0 top
CW2  2nH  [C0201]  36.96 28.18 180 top
CW5  NC  [C0201]  38.16 25.55 135 top
CW6  NC  [C0201]  38.08 27.88 0 top
CW7  1uF  [C0201]  39.53 27.24 0 bottom
CW8  1uF  [C0201]  39.52 26.58 0 bottom
CW9  4.7uF  [C0402]  38.67 22.95 270 top
CW10  1uF  [C0201]  39.11 23.66 90 bottom
CW11  1uF  [C0201]  32.18 29.58 270 top
CW12  1uF  [C0201]  37.95 22.59 270 top
CW13  1uF  [C0201]  31.14 27.1 315 top
CW15  NC/5.6pF  [C0201]  26.46 23.91 90 bottom
CW16  NC  [C0201]  36.16 34.78 180 top
CW17  NC  [C0201]  36.16 36.65 180 top
CW19  10uF  [C0603]  30.69 32.23 180 top
CW20  NC  [C0201]  37.96 34.7 180 top
CW21  NC  [C0201]  37.96 36.41 180 top
CW22  4.7uF  [C0402]  35.01 16.76 180 top
CW23  NC/4.7uF  [C0402]  31.12 17.17 90 top
CW24  4.7uF  [C0402]  35.4 20.5 0 top
CW25  1uF  [C0201]  33.07 20.35 180 top
CW26  1uF  [C0201]  29.93 26.3 135 top
CW27  1uF  [C0201]  30.61 22.35 315 top
CW28  1uF  [C0201]  32.15 20.73 45 top
CW29  4.7uF  [C0402]  37.94 21.64 0 top
CW30  NC  [C0201]  35.67 27.98 180 top
CW31  1pF  [C0201]  35.67 29.22 0 top
CW32  10pF  [C0201]  35.92 30.1 270 top
CW33  470pF  [C0402]  39.68 32 0 top
CW34  10uF  [C0603]  43.8 32.42 90 top
CW35  10uF  [C0603]  43.76 29.64 270 top
D1  PT2C051N  [ESD0402]  41.31 119.63 0 top
D2  PT2C051N  [ESD0402]  40.81 122.56 90 top
D3  PT2C051N  [ESD0402]  41.65 122.53 90 top
D4  PT2C051N  [ESD0402]  42.71 122.52 90 top
D5  PT2C051N  [ESD0402]  39.87 122.6 90 top
D6  XBS104S14  [SOD155_270H118]  25.39 15.95 270 top
D7  PT2C051N  [ESD0402]  38.84 14.18 270 top
D8  PT2C051N  [ESD0402]  39.29 10.84 270 top
D9  PT2C051N  [ESD0402]  40.3 10.83 270 top
D10  PT2C051N  [ESD0402]  43.22 10.17 180 top
D11  PT2C051N  [ESD0402]  38.93 8.92 270 top
D12  PT2C051N  [ESD0402]  36.82 50.91 0 top
D13  1N4148  [SOD130_264H140]  36.93 45.34 270 top
DA1  ESD5451X-2/TR/NC  [ESD0402]  43.53 25.04 90 top
DA2  ESD5451X-2/TR/NC  [ESD0402]  42.49 25.03 90 top
DA3  ESD5451X-2/TR  [ESD0402]  6.4 123.61 270 top
DA4  ESD5451X-2/TR  [ESD0402]  6.4 121.76 90 top
DA5  PT2C051N  [ESD0402]  17.14 125.56 180 top
DA6  PT2C051N  [ESD0402]  15.04 125.55 0 top
DA7  PT2C051N  [ESD0402]  6.44 19.63 270 top
DA8  PT2C051N  [ESD0402]  6.44 17.79 90 top
DA9  PT2C051N  [ESD0402]  9.8 125.65 0 top
DA10  PT2C051N  [ESD0402]  11.85 125.66 180 top
DA11  PT2C051N  [ESD0402]  6.92 25.26 90 top
DA12  PT2C051N  [ESD0402]  6.87 23.31 90 top
DA13  ESD5451X-2/TR  [ESD0402]  6.58 46.2 270 top
DA14  ESD5451X-2/TR  [ESD0402]  6.36 44.32 270 top
DA15  ESD5451X-2/TR  [ESD0402]  3.17 47.22 0 top
DA16  ESD5451X-2/TR  [ESD0402]  6.6 42.4 270 top
DA17  ESD5451X-2/TR  [ESD0402]  5.09 47.22 0 top
DA18  PESDEC2XD5VBF  [ESD0201]  39.28 41.7 135 top
DC1  NC/PT2C051N  [ESD0402]  34.68 12.56 270 top
DC2  PT2C051U  [ESD0402]  36.96 12.98 270 top
DC3  PT2C051U  [ESD0402]  33.26 12.24 270 top
DC4  PT2C051N  [ESD0402]  35.77 12.97 270 top
DC5  PT2C051N  [ESD0402]  30.91 13.83 0 top
DC6  PT2C051N  [ESD0402]  34.23 14.03 0 top
DC7  PT2C051U  [ESD0402]  32.11 11.81 270 top
DC8  PT2C051U  [ESD0402]  28.78 7.8 0 top
DL1  DSK24  [SOD180_270H110]  16.16 59.54 180 top
DL2  PT2C051N  [ESD0402]  7.91 67 90 top
DL3  PT2C051N  [ESD0402]  6.97 66.75 270 top
DL4  PT2C051N  [ESD0402]  6.99 64.89 90 top
DL5  PT2C051N  [ESD0402]  6.99 70.48 270 top
DL6  PT2C051N  [ESD0402]  6.99 68.63 90 top
DL7  PT2C051N  [ESD0402]  7.92 63 270 top
DL8  PESDEC2XD5VBF  [ESD0201]  4.28 62.36 270 bottom
DL9  PESDEC2XD5VBF  [ESD0201]  3.67 62.36 270 bottom
DP1  PTVSHC3N4V5B  [DFN3P130B200_200H65]  7.18 14.33 90 top
DP2  LED-0402-G/NC  [LED0402]  7.77 22.53 90 top
DP3  DSK24  [SOD155_270H118]  25.35 24.38 90 top
DU1  PT2C051N  [ESD0402]  5.39 52.16 90 top
DU2  PT2C051U  [ESD0402]  4.27 55.34 180 top
DU3  PT2C051U  [ESD0402]  2.36 55.34 0 top
DU4  PT2C051N  [ESD0402]  9.49 33.26 0 top
DU6  PTVSHC3N18VU  [DFN3P130B200_200H65]  14.91 11.93 270 top
DU7  PT2C051N  [ESD0402]  22.21 11.24 180 top
DU8  PT2C051N  [ESD0402]  20.35 11.24 0 top
DU9  PT2C051N  [ESD0402]  23.07 15.71 0 top
DU10  PT2C051N  [ESD0402]  22.65 13.25 0 top
DU11  PT2C051N  [ESD0402]  18.5 11.68 270 top
DU12  PT2C051N  [ESD0402]  17.37 11.67 270 top
FID1  MARK  [FIDICALMARK]  13.67 127.43 270 bottom
FID2  MARK  [FIDICALMARK]  6.75 18.68 270 bottom
FID3  MARK  [FIDICALMARK]  42.55 7.51 270 bottom
FID4  MARK  [FIDICALMARK]  42.26 51.88 270 top
H1  HOLE-C9  [KEZI]  3.77 127.97 180 top
H2  HOLE-C9  [KEZI]  43 14.18 270 top
H3  HOLE-C9  [KEZI]  1.98 77.97 90 top
H4  HOLE-C9  [KEZI]  42.98 71.56 90 top
H5  HOLE-C9  [KEZI]  42.97 109.98 270 top
J1  -  [FPC6-0_3-2_5X4_5H1_0L]  2.92 51.9 270 top
J2  CON6  [FPC6-0_3-2_5X4_5H1_0L]  41.79 126.66 90 top
J3  CON5  [CA0103021-R]  39.48 103.08 90 top
J4  CON5  [CA0103021-R]  1.7 85.18 90 top
J5  CON5  [CA0103021-R]  30.45 33.84 180 top
J6  CON5  [CA0103021-R]  18.25 28.87 180 top
J7  CON5  [CA0103021-R]  41.17 23.65 90 top
J8  CON5  [CA0103021-R]  34.56 50.56 270 top
J9  CON5  [CA0103021-R]  23.19 118.55 0 top
J10  CON5  [CA0103021-R]  8 48.76 90 top
J11  MOTOR AC  [WF_080_2P]  25.64 12.35 0 top
J12  CON6  [FPC6-0_3-2_5X4_5H1_0L]  42.09 7.46 0 top
J13  CON5  [CA0103021-R]  32.81 15.61 0 top
J14  CON5  [CA0103021-R]  1.7 107.55 270 top
JA1  MIC/NC  [WF_080_2P]  42.23 21.06 90 top
JA2  MIC  [WF_080_2P]  5.33 122.59 270 top
JA3  SPK  [WF_080_2P]  16.28 126.66 180 top
JA4  SPK  [WF_080_2P]  5.6 18.76 270 top
JA5  SPK  [WF_080_2P]  10.86 126.68 180 top
JA6  SPK  [WF_080_2P]  5.59 24.66 270 top
JA7  -  [FPC6-0_3-2_5X4_5H1_0L]  3.24 43.56 270 top
JC1  FPC-21P-0.3MM  [FH26-21S]  36.98 8.3 0 top
JL1  CON45PIN_LCM  [45PIN_UD_FPC_863]  2.83 72.03 270 top
JP1  5P_1.25MM  [CON-R5S-P1_3-H1_5-R]  5.84 12.26 270 top
JP2  NC/J_BAT_TS  [BAT_SMD-3]  5.83 8.1 180 top
JU1  CON31  [FH26-31S]  17.61 8.46 0 top
JV1  HEADER 31_0  [FH26-31S]  33.73 127.23 180 top
JV2  FPC-39P-0.3MM  [PFC41P60B13500_350H100]  39.06 59.92 90 top
JV3  FPC-21P-0.3MM  [FH26-21S]  20.61 127.23 180 top
JW1  ANT-IPX  [RF-CD-ARF003-P01A-PAD10]  42 42.39 270 top
JW2  ANT-IPX  [RF-CD-ARF003-P01A-PAD10]  42.02 37.8 270 top
K1  UPDATA  [KEY_3X3]  41.28 48.11 180 top
LL1  4.7uH@2A DCR<0.1R  [LP400_400H180]  25.92 57.59 270 top
LL2  10uH@1A DCR<0.1R  [LP400_400H180]  18.68 56.03 90 top
LP1  1uH-4A  [LP200_250H100]  30.15 42.86 0 top
LP2  0.33uH-5A  [LP200_250H100]  28.38 47.61 90 top
LP3  0.33uH-5A  [LP200_250H100]  23.63 48.17 90 top
LP4  0.47uH-5A  [LP200_250H100]  14.75 48.42 180 top
LP5  0.47uH-5A  [LP200_250H100]  21.22 48.15 90 top
LP6  1uH-4A  [LP200_250H100]  14.76 46.01 180 top
LP7  1uH-4A  [LP200_250H100]  14.12 40.56 180 top
LP8  1uH-4A  [LP200_250H100]  14.1 38.15 180 top
LP9  1uH-4A  [LP200_250H100]  29.98 40.44 0 top
LP10  1uH-3A/1uH-5A  [LP200_250H100]  16.28 20.7 270 top
LP11  4.7uH/2A  [LP200_250H100]  22.66 22.45 0 top
LP16  2.2uH-2A  [LP200_250H100]  18.86 19.21 90 top
LU1  NC/CMF0806UD900MFR  [LC4B120_200H120]  20.15 13.12 270 top
LW1  4.7uH  [L0603]  37.73 20.64 180 top
LW2  NC/2.2uH  [LP200_250H100]  29.07 17.4 0 top
LW3  1.4nH  [L0201]  39.5 25.86 0 bottom
LW4  1.2nH  [L0201]  36.25 27.35 0 top
LW5  1.5nH  [L0201]  35.67 28.61 180 top
NOREF  *  [unnamed]  7.41 125.9 270 top
NOREF#2  -  [#2]  -4.19 9.8 0 top
NOREF#3  *  [unnamed]  42.81 96.71 270 top
NOREF#4  -  [#2]  8.51 9.8 270 top
NOREF#5  -  [#2]  1.8 130 0 top
QC1  STS2301  [SOT3P95B130_290H103]  29.72 11.68 270 top
QV1  SI2300  [SOT23]  28.85 121.05 90 top
R1  NC/47K-1%  [R0201]  36.55 96.65 0 top
R2  10K-1%  [R0201]  17.55 77.95 90 top
R3  NC/47K-1%  [R0201]  36.55 95.99 180 top
R4  NC/1K-1%  [R0201]  35.62 95.76 90 top
R5  10K-1%  [R0201]  18.23 77.95 90 top
R6  1K-1%  [R0201]  35.62 96.9 270 top
R7  NC-1%  [R0201]  17.97 78.43 270 bottom
R8  NC/10K-1%  [R0201]  16.89 77.96 90 top
R9  NC/3.9K-1%  [R0201]  18.63 78.45 270 bottom
R10  NC-1%  [R0201]  18.36 82.22 90 bottom
R11  0R  [R0201]  19.67 82.84 180 bottom
R12  10K-1%  [R0201]  18.35 83.37 90 bottom
R13  NC-1%  [R0201]  19.25 83.69 0 bottom
R14  200R-1%  [R0201]  20.47 80.46 90 bottom
R15  1K  [R0201]  17.95 91.01 0 bottom
R17  NC/0R  [R0201]  18.91 90.5 270 bottom
R18  10M  [R0201]  12.14 85.44 270 top
R19  0R  [R0201]  15.54 88.48 180 top
R21  NC  [R0201]  10.76 77.98 0 top
R22  0R  [R0201]  10.78 78.64 0 top
R23  470K  [R0201]  9.29 79.89 270 top
R24  NC  [R0201]  9.56 78.34 0 top
R25  NC/5.6K-1%  [R0201]  40.64 120.68 90 top
R26  NC/10K-1%  [R0201]  41.31 120.68 90 top
R27  10K-1%  [R0201]  40.61 118.81 0 top
R28  1K  [R0201]  42.68 120.68 90 top
R29  1K  [R0201]  39.28 120.71 90 top
R30  NC/10K  [R0201]  35 90.96 90 bottom
R31  NC/10K  [R0201]  41.4 116.32 180 top
R32  NC/10K  [R0201]  35.96 90.08 90 bottom
R33  NC/10K  [R0201]  33.69 90.18 180 bottom
R34  1K  [R0201]  40.8 50.26 180 top
R36  0R  [R0201]  20.69 75.27 0 top
R37  0R  [R0201]  23.1 76.78 180 bottom
R38  2K  [R0201]  38.5 63.5 270 bottom
R39  2K  [R0201]  39.15 63.49 270 bottom
R40  2.2R  [R0402]  27.44 14.56 180 top
R42  NC/0R  [R0201]  19.93 74.34 270 top
R43  4.7K  [R0201]  19.39 76.64 180 top
R44  NC/10K  [R0201]  18.48 77.14 0 bottom
R46  0R  [R0201]  16.78 75.47 90 top
R48  200R-1%  [R0201]  21.11 80.47 90 bottom
R49  10K-1%  [R0201]  37.88 16.75 270 top
R50  NC/5.6K-1%  [R0201]  38.43 12.67 270 top
R51  NC/10K-1%  [R0201]  39.11 12.68 270 top
R52  1K  [R0201]  41.35 10.69 0 top
R53  1K  [R0201]  38.44 10.73 270 top
R57  1K  [R0201]  39.98 120.7 270 top
R58  1K  [R0201]  42.02 120.68 270 top
R59  10K  [R0201]  41.81 117.48 180 top
R60  10K  [R0201]  40.64 117.51 0 top
R61  1K  [R0201]  37.73 12.67 90 top
R62  1K  [R0201]  39.73 12.68 90 top
R63  10K  [R0201]  39.64 14.2 270 top
R64  10K  [R0201]  36.94 14.25 0 top
R66  NC/3.01K-1%  [R0201]  22.66 81.17 90 bottom
R67  200R-1%  [R0201]  19.53 80.52 0 bottom
R68  NC/3.01K-1%  [R0201]  23.54 80.71 180 bottom
R70  75R  [R0201]  16.07 91.45 90 bottom
R71  75R  [R0201]  16.75 91.45 90 bottom
R72  0R  [R0201]  21.74 83.62 270 bottom
R73  NC  [R0201]  24.62 83.46 90 bottom
R74  0R  [R0201]  24.98 77.98 90 top
R75  0R  [R0201]  25.38 82.94 225 bottom
R76  0R  [R0201]  9.62 82.88 0 top
RA1  0R  [R0201]  33.68 89.47 180 bottom
RA2  0R  [R0201]  34.91 93.8 270 bottom
RA3  0R  [R0201]  33.09 94.83 180 bottom
RA4  0R  [R0201]  32.68 93.69 180 bottom
RA5  1K  [R0201]  4.39 119.54 90 top
RA6  220K/NC  [C0201]  7.39 113.48 270 bottom
RA7  1.5K  [R0201]  5.3 119.28 0 top
RA8  0R/4.7uF  [R0402]  4.65 114.41 180 top
RA9  0R/NC  [R0402]  7.74 111.08 90 top
RA10  NC/0R  [R0402]  6.91 111.01 270 top
RA11  1.5K  [R0201]  5.3 118.62 0 top
RA12  NC/47K  [R0201]  9.66 119.97 90 bottom
RA13  1K  [R0201]  4.41 118.36 270 top
RA14  NC/1M  [R0201]  9.91 120.9 180 bottom
RA15  0R/NC  [R0402]  12.32 113.34 90 top
RA16  0R/NC  [R0402]  4.65 113.56 0 top
RA17  NC/10K  [R0201]  8.95 119.97 90 bottom
RA18  0R/NC  [R0402]  7.95 120.1 270 top
RA19  1K  [R0201]  12.73 123.49 90 top
RA20  NC/0R  [R0201]  8.28 119.94 90 bottom
RA21  1.5K  [R0201]  10.36 123.17 180 top
RA23  1.5K  [R0201]  10.36 122.56 180 top
RA25  1K  [R0201]  12.74 122.35 270 top
RA26  0R  [R0201]  4.78 115.16 180 top
RA27  2K  [R0201]  10.85 119.77 90 bottom
RA28  2K  [R0201]  11.58 119.77 90 bottom
RA29  2K  [R0201]  12.71 115.23 270 top
RA30  2K  [R0201]  5.08 117.39 90 bottom
RA31  1K  [R0201]  4.47 116.83 90 bottom
RA32  1K  [R0201]  3.37 115.09 270 bottom
RA33  NC/100K  [R0201]  3.21 47.55 180 bottom
RA34  22R  [R0201]  4.97 44.55 0 bottom
RA35  22R  [R0201]  3.51 44.45 90 bottom
RA36  0R/NC  [R0201]  5.09 46.52 0 bottom
RA39  47K  [R0201]  3.55 39.19 0 bottom
RA40  47K  [R0201]  24.98 119.66 0 top
RA41  0R  [R0201]  7.12 35.48 90 top
RA42  0R  [R0201]  26.32 121 180 top
RA43  0R  [R0201]  4.72 35.51 270 top
RA44  0R  [R0201]  16.61 124.47 90 top
RA45  0R  [R0201]  6.46 35.5 90 top
RA46  0R  [R0201]  26.32 120.36 180 top
RA47  0R  [R0201]  15.84 124.55 90 top
RA48  0R  [R0201]  3.73 35.51 270 top
RA49  47K  [R0201]  17.52 119.54 180 top
RA50  47K  [R0201]  5.75 28.23 270 top
RA51  0R  [R0201]  7.14 29.32 90 top
RA52  0R  [R0201]  4.4 28.74 270 top
RA53  0R  [R0201]  18.84 120.77 180 top
RA54  0R  [R0201]  11.37 124.23 90 bottom
RA55  0R  [R0201]  6.48 29.34 90 top
RA56  0R  [R0201]  3.75 28.75 270 top
RA57  0R  [R0201]  18.84 120.13 180 top
RA58  0R  [R0201]  10.45 124.28 90 bottom
RA59  0R  [R0402]  6.95 88.5 180 top
RA60  0R  [R0402]  4.22 95.71 0 top
RA61  2K-1%  [R0201]  5.54 87.42 0 top
RA62  20K-1%  [R0201]  5.36 85.24 90 top
RA63  20K-1%  [R0201]  4.69 85.24 90 top
RA64  51K  [R0201]  2.93 90.53 270 top
RA65  2K-1%  [R0201]  4.37 87.45 0 top
RA66  2K-1%  [R0201]  10.21 92.56 0 top
RA67  20K-1%  [R0201]  9.93 94.15 270 top
RA68  20K-1%  [R0201]  9.25 94.15 270 top
RA69  2K-1%  [R0201]  9 92.53 0 top
RA72  0R  [R0201]  4.73 41.68 0 bottom
RA73  0R  [R0201]  4.59 47.24 0 bottom
RA74  0R  [R0201]  3.2 46.85 0 bottom
RA75  0R  [R0201]  4.99 45.83 0 bottom
RA76  0R  [R0201]  7.13 43.97 270 top
RA77  0R  [R0201]  10.35 123.81 0 top
RA78  0R  [R0201]  10.36 121.92 0 top
RA79  NC/0R  [R0201]  10.35 124.44 0 top
RA80  NC/0R  [R0201]  10.36 121.28 0 top
RA81  0R/NC  [R0201]  5.26 89.54 270 top
RA82  0R/NC  [R0201]  4.56 89.54 270 top
RA83  0R/NC  [R0201]  8.11 90.56 0 top
RA84  0R/NC  [R0201]  8.11 91.22 0 top
RA85  NC/0R  [R0201]  5.11 114.79 90 bottom
RA86  NC/0R  [R0201]  4.44 114.79 90 bottom
RA87  NC  [R0201]  6.11 111.16 90 top
RA88  NC  [R0201]  5.46 111.15 90 top
RA89  47K  [R0201]  23.52 123.34 0 top
RA90  1K  [R0201]  26.51 122.3 0 top
RA91  1K  [R0201]  26.51 121.69 0 top
RA92  47K  [R0201]  16.62 122.87 180 bottom
RA93  0R  [R0201]  6.85 37.6 180 top
RA94  0R  [R0201]  6.85 38.26 180 top
RA95  47K  [R0201]  5.01 39.54 270 bottom
RA96  0R  [R0201]  6.85 30.96 180 top
RA97  0R  [R0201]  6.85 31.62 180 top
RA98  47K  [R0201]  5.09 28.73 90 top
RA99  33R  [R0201]  35.01 91.18 225 top
RA100  33R  [R0201]  43.26 26.53 90 top
RA101  33R  [R0201]  42.65 26.53 90 top
RA102  33R  [R0201]  7.36 123.21 0 top
RA103  33R  [R0201]  7.36 122.2 0 top
RC1  33R  [R0201]  35.14 89.62 0 top
RC2  NC/2.2R  [R0402]  28.81 9.59 0 top
RC3  NC/47K  [R0201]  32.95 14.01 90 top
RC4  NC/10K  [R0201]  35.77 14.25 180 top
RC5  100K  [R0201]  30.5 13.61 180 bottom
RC6  1K  [R0201]  32.27 14.01 270 top
RC7  1K  [R0201]  29.19 13.65 0 bottom
RC8  10K  [R0201]  29.19 12.94 180 bottom
RC9  10K  [R0201]  28.85 7.01 180 top
RD1  240R-1%  [R0402]  21.57 116.89 180 top
RD2  120R-1%  [R0402]  25.15 97.71 90 top
RL5  100K  [R0201]  29.21 60.63 90 top
RL7  100K  [R0201]  30.06 60.59 270 top
RL8  0R  [R0201]  11.7 58.19 270 top
RL9  0R  [R0402]  10.37 57.58 270 top
RL11  4.42R-1%  [R0603]  10.68 55.95 0 top
RL13  1M  [R0201]  12.36 58.2 270 top
RL15  0R  [R0201]  32.84 57.48 0 top
RL16  4.42R-1%  [R0603]  10.69 54.66 0 top
RL17  0R  [R0201]  32.84 58.1 0 top
RL18  NC/15K-1%  [R0201]  9.01 61.79 270 bottom
RL19  NC/12K-1%  [R0201]  6.7 63.55 180 bottom
RL20  NC/12K-1%  [R0201]  7.89 63.14 0 bottom
RL21  NC/12K-1%  [R0201]  6.74 65.39 180 bottom
RL22  NC/15K-1%  [R0201]  5.57 64.77 0 bottom
RL23  NC/15K-1%  [R0201]  6.5 64.48 270 bottom
RL24  NC  [R0201]  5.58 73.52 0 bottom
RL25  NC  [R0201]  6.81 72.03 90 bottom
RL26  NC  [R0201]  6.7 73.15 180 bottom
RL27  NC  [R0201]  4.05 74.23 0 top
RL30  0R  [R0201]  5.89 71.18 180 bottom
RL31  0R  [R0201]  5.89 72.44 180 bottom
RL32  NC  [R0201]  5.89 71.8 180 bottom
RL33  NC  [R0201]  5.89 70.53 180 bottom
RL34  2K  [R0201]  3.77 68.04 270 bottom
RL35  2K  [R0201]  4.34 66.86 0 bottom
RL36  NC  [R0201]  5.22 68.14 90 bottom
RL37  NC  [R0201]  7.82 69.18 0 bottom
RL38  NC  [R0201]  10.33 61.79 90 bottom
RL42  NC/15K-1%  [R0201]  9.65 61.79 270 bottom
RL43  NC/12K-1%  [R0201]  7.84 64.85 0 bottom
RL44  0R  [R0201]  2.89 73.96 180 top
RL45  0R  [R0201]  6.99 71.93 270 top
RL47  15K-1%  [R0201]  4.66 73.3 270 bottom
RL48  12K-1%  [R0201]  5.01 72.08 270 bottom
RM3  200R-1%  [R0201]  19.28 88.99 180 bottom
RM36  33R  [R0201]  8.61 98.84 90 bottom
RM37  NC/10K  [R0201]  20.82 89.7 0 bottom
RM38  49.9K  [R0201]  11.52 103.86 270 bottom
RM41  100K/NC  [R0201]  10.22 99.69 180 bottom
RP2  NC  [R0201]  23.03 62.39 180 top
RP3  470K  [R0201]  8.86 28.6 0 top
RP4  0.01R-1%  [R0402]  19.66 36.35 270 top
RP5  0R  [R0201]  9.22 27.74 90 top
RP6  0.01R-1%  [R0603]  31.34 46.1 180 top
RP7  NC  [R0201]  6.84 56.7 0 top
RP8  NC/10K  [R0201]  8.85 29.27 0 top
RP9  2.2K  [R0201]  16.6 30.63 270 top
RP10  2.2K  [R0201]  15.89 30.63 270 top
RP11  0.01R-1%  [R0603]  32.91 49.67 90 top
RP13  0.01R-1%  [R0603]  32.36 47.62 0 top
RP14  0.01R-1%  [R0603]  28.82 51.76 90 top
RP15  0.01R-1%  [R0402]  10.24 45.44 180 top
RP17  0.01R-1%  [R0603]  23.08 51.1 90 top
RP19  0.01R-1%  [R0201]  8.47 25.22 180 top
RP20  NC  [R0402]  10.59 44.12 90 top
RP21  NC  [R0201]  19.62 43.09 0 bottom
RP22  0.01R-1%  [R0402]  19.3 32.65 90 top
RP23  0.01R-1%  [R0402]  15.02 32.55 0 top
RP24  0.01R-1%  [R0603]  12.48 49.81 90 top
RP28  NC  [R0402]  18.85 30.97 180 top
RP29  0.01R-1%  [R0402]  23.03 33.43 90 top
RP30  0.01R-1%  [R0603]  19.38 51.53 90 top
RP32  0.01R-1%  [R0201]  23.79 33.27 90 top
RP33  0.01R-1%  [R0402]  24.57 33.34 90 top
RP36  0.01R-1%  [R0402]  26.77 35.68 180 top
RP38  0.01R-1%  [R0402]  25.68 31.67 90 top
RP39  0.01R-1%  [R0201]  6.84 55.69 0 top
RP41  0.01R-1%  [R0603]  11.81 46.52 180 top
RP42  NC  [R0402]  23.45 29.92 180 top
RP45  0.01R-1%  [R0603]  10.6 41.88 90 top
RP49  NC  [R0603]  11.2 38.82 180 top
RP50  0.01R-1%  [R0201]  22.82 61.77 180 top
RP53  0.01R-1%  [R0402]  20.73 29.91 0 top
RP54  0.01R-1%  [R0603]  32.2 37.9 270 top
RP55  1K  [R0201]  26.88 42.14 180 bottom
RP56  0.01R-1%  [R0402]  27.03 38.07 90 top
RP57  NC  [R0201]  23.52 43.01 180 bottom
RP77  0R  [R0201]  21.04 22.44 270 bottom
RP82  0R  [R0603]  19.01 23.78 90 top
RP87  0.01R-1%  [R0603]  25.08 20.47 180 top
RP127  0.01R-1%  [R0603]  26.3 54.65 180 top
RP198  0.01R-1%  [R0402]  8.41 93.86 90 top
RP220  0.01R  [R0402]  12.05 34.15 0 top
RP225  0R  [R0201]  12.81 13.7 0 bottom
RP228  NC/10K  [R0402]  4.02 15.12 0 top
RP234  10K  [R0201]  14.27 14.96 180 bottom
RP236  NC/0.01R  [R0603]  11.93 15.3 270 top
RP237  NC  [R0201]  14.02 13.73 0 bottom
RP240  NC/0.01R  [R0603]  10.65 15.31 270 top
RP242  0.01R-1%  [R0402]  18.83 29.88 0 top
RP243  0R  [R0201]  8.73 26.1 90 top
RP244  0R  [R0201]  7.87 27.73 90 top
RP245  2K  [R0201]  7.71 21.04 90 top
RP246  0.01R-1%-0805  [RA6P45B125_200H60]  8.63 19.56 180 top
RP247  0R  [R0201]  13.18 21.02 90 bottom
RP248  0R  [R0201]  14.08 21.07 90 bottom
RP249  NC/0R  [R0402]  10.03 27.46 270 top
RP250  NC/0R  [R0201]  16.17 22.28 90 bottom
RP251  NC/470R  [R0201]  13.62 27.18 270 top
RP252  NC/470R  [R0201]  12.93 27.17 270 top
RP253  NC  [R0603]  16.98 24.5 180 top
RP254  10K  [R0201]  21.78 27.72 90 bottom
RP255  150K-1%  [R0201]  25.23 25.82 90 bottom
RP256  20K-1%  [R0201]  24.64 27.5 90 bottom
RP257  NC  [R0201]  19.58 24.38 315 bottom
RP258  0R  [R0201]  21.77 26.54 270 bottom
RP259  NC/0R  [R0201]  18.02 13.56 180 top
RP261  NC/0R  [R0201]  16.43 14.61 180 top
RP263  10K  [R0201]  17.34 16.7 270 top
RP265  0R  [R0201]  11.53 27.23 270 top
RP266  0R  [R0201]  12.17 27.22 270 top
RP267  NC  [R0201]  24.67 44.88 45 bottom
RP268  NC  [R0201]  23.83 45.35 90 bottom
RP269  NC  [R0201]  20.64 44.16 180 bottom
RP270  NC  [R0201]  22.52 45.16 0 bottom
RP271  NC/10K  [R0201]  17.71 16 90 bottom
RP272  NC/10K  [R0201]  18.31 16.01 90 bottom
RP287  NC  [R0603]  10.78 108.43 270 bottom
RP290  0.01R-1%  [R0402]  12.46 102.64 90 bottom
RP291  0.01R-1%  [R0402]  8.75 100.8 180 bottom
RP292  NC  [R0402]  11.03 102.8 180 bottom
RP293  0.01R-1%  [R0201]  8.31 105.54 0 bottom
RP294  0.01R  [R0402]  12.05 35 0 top
RP295  NC  [R0402]  13.4 35.03 270 top
RP296  NC  [R0603]  23.3 78.37 180 top
RP297  0.01R-1%  [R0603]  20.59 78.98 0 top
RP298  30K-1%  [R0201]  22.05 20.87 0 bottom
RP299  10K-1%  [R0201]  20.77 20.49 270 bottom
RP300  NC  [R0201]  23.51 41.07 0 bottom
RP301  NC/0R  [R0201]  16.95 16.94 0 bottom
RP302  NC/0R  [R0201]  16.95 17.55 0 bottom
RP303  0R  [R0201]  18.22 17.29 180 top
RP304  0R  [R0201]  19.33 17.29 180 top
RU1  47K  [R0201]  6.12 52.34 90 top
RU2  NC/0R  [R0402]  11.35 33.27 0 top
RU3  5.1R  [R0201]  3.01 56.37 90 top
RU4  5.1R  [R0201]  3.68 56.37 90 top
RU5  1K  [R0201]  6.81 53.4 0 top
RU6  NC  [R0201]  5.63 53.42 180 top
RU7  100K  [R0201]  11.21 28.49 225 top
RU8  6K8-1%  [R0201]  9.1 30.25 90 top
RU9  0R  [R0201]  23.69 16.71 90 top
RU10  0R  [R0201]  22.2 12.4 180 top
RU11  5.1R  [R0201]  19.68 13.1 90 top
RU12  5.1R  [R0201]  20.61 13.11 90 top
RU14  100K  [R0201]  21.4 13.55 270 top
RU15  100K  [R0201]  18.36 12.94 180 top
RU17  0R  [R0201]  14.33 28.65 90 top
RU18  0R  [R0201]  12.5 28.65 90 top
RU34  NC/0R  [R0201]  13.71 28.65 90 top
RU35  NC/0R  [R0201]  13.1 28.65 90 top
RV1  33R  [R0201]  30.96 83.31 0 bottom
RV2  100K  [R0201]  37.85 121.84 90 top
RV3  100K  [R0201]  37.15 121.83 90 top
RV4  100K  [R0201]  39.76 54.72 180 bottom
RV5  NC  [R0201]  37.1 54.25 90 bottom
RV6  100K  [R0201]  38.79 54.27 90 bottom
RV7  2K  [R0201]  36.58 127.51 180 bottom
RV8  2K  [R0201]  36.38 126.62 90 bottom
RV9  0R  [R0402]  35.71 60.57 270 top
RV10  0R  [R0402]  41.42 67.5 135 top
RV11  47K  [R0201]  35.49 62.05 270 top
RV12  10K  [R0201]  37.87 65.72 90 bottom
RV13  0R  [R0603]  29.44 124.14 0 top
RV14  NC/4.7R  [R0402]  29.24 123.02 0 top
RV15  22R  [R0201]  30.91 121.03 270 top
RV16  22R  [R0201]  30.85 119.68 270 top
RV17  91K  [R0201]  34.4 119.72 0 top
RV18  0.22R-1%  [R0603]  35.93 122.15 270 top
RV19  10K  [R0201]  33.19 119.72 180 top
RV20  100K  [R0201]  31.58 120.71 270 bottom
RV21  NC/10K  [R0201]  38.53 65.73 90 bottom
RV22  100K  [R0201]  25.14 127.2 270 bottom
RV23  100K  [R0201]  23.98 127.76 270 bottom
RV24  2K  [R0201]  38.01 56.23 90 bottom
RV25  2K  [R0201]  40.09 56.23 90 bottom
RV26  33R  [R0201]  32.25 77.66 270 top
RW1  33R  [R0201]  32.65 86.51 0 bottom
RW4  100K  [R0201]  37.02 18.16 0 top
RW9  NC/33K  [R0201]  33.92 86.04 45 bottom
RW10  NC/33K  [R0201]  33.5 88.05 0 bottom
RW11  NC/33K  [R0201]  34.45 87.57 90 bottom
RW12  NC/33K  [R0201]  33.49 87.43 0 bottom
RW13  NC/33K  [R0201]  35.15 87.57 90 bottom
RW14  NC/33K  [R0201]  35.3 86.4 45 bottom
RW15  NC/100K  [R0201]  27.54 30.75 90 bottom
RW17  100K  [R0201]  26.67 28.24 180 bottom
RW18  0R  [R0201]  35.91 35.75 90 top
RW21  0R  [R0201]  37.71 32.09 90 top
RW22  0R  [R0201]  37.71 35.56 90 top
RW24  NC/10K  [R0201]  32.93 32.28 0 top
RW25  NC/10K  [R0201]  37.02 17.51 180 top
RW26  10K  [R0201]  42.44 32.92 0 top
RW27  10K  [R0201]  42.44 32.23 0 top
RW28  NC/10K  [R0201]  42.44 31.56 0 top
RW29  NC/10K  [R0201]  39.86 32.77 180 top
RW31  NC/10K  [R0201]  42.44 30.86 180 top
RW32  NC/10K  [R0201]  39.19 29.01 90 bottom
RW33  NC/0R  [R0201]  35.02 17.8 270 top
RW34  NC/0R  [R0201]  31.9 17.63 90 top
RW35  0R  [R0201]  38.33 26.99 90 top
RW36  3pF  [R0201]  37.21 27.32 90 top
RW37  NC/10K  [R0201]  32.85 17.39 0 top
RW38  NC/100K  [R0201]  12.42 83.02 0 top
RW60  NC  [R0201]  34.77 29.45 270 top
RW61  0R  [R0201]  34.09 29.45 270 top
RW62  NC  [R0201]  38.21 18.15 180 top
T3  test  [TP30]  20.63 93.63 0 bottom
T4  test  [TP30]  22.63 93.97 0 bottom
T5  test  [TP30]  29.69 107.46 0 bottom
T6  test  [TP30]  31.07 105.86 0 bottom
T7  test  [TP30]  18.75 98.26 0 bottom
T8  test  [TP30]  21.75 97.56 0 bottom
T9  test  [TP30]  19.6 102.09 180 top
T10  test  [TP30]  31.78 105.87 0 bottom
T11  test  [TP30]  18.75 97.75 0 bottom
T12  test  [TP30]  21.75 98.07 0 bottom
T13  test  [TP30]  19.2 105.87 0 bottom
T14  test  [TP30]  15.66 112.23 0 bottom
T15  test  [TP30]  27.63 93.47 0 bottom
T16  test  [TP30]  29.63 93.48 0 bottom
T17  test  [TP30]  18.48 105.86 0 bottom
T18  test  [TP30]  19.19 113.05 0 bottom
T19  test  [TP30]  29.1 97.05 0 bottom
T20  test  [TP30]  32.12 97.93 0 bottom
T21  test  [TP30]  30.37 113.85 0 bottom
T22  test  [TP30]  18.47 113.06 0 bottom
T23  test  [TP30]  31.06 113.04 0 bottom
T24  test  [TP30]  24.78 113.84 0 bottom
T26  test  [TP30]  31.79 113.05 0 bottom
T27  SATO  [TP30]  25.31 96.04 180 top
T28  SDTO  [TP30]  25.63 91.91 180 bottom
T29  test  [TP30]  21.99 105.86 0 bottom
T30  test  [TP30]  27.58 113.05 0 bottom
T33  test  [TP30]  32.12 98.44 0 bottom
T34  test  [TP30]  22.7 109.05 0 bottom
T35  test  [TP30]  26.88 110.66 0 bottom
T36  test  [TP30]  29.1 96.55 0 bottom
T37  test  [TP30]  22.68 107.47 0 bottom
T38  test  [TP30]  27.56 111.45 0 bottom
T39  test  [TP30]  23.37 110.65 0 bottom
T41  test  [TP30]  20.52 85.38 180 bottom
T42  test  [TP30]  21.27 88.38 180 bottom
T43  test  [TP30]  25.12 88.71 180 bottom
T44  test  [TP30]  26.19 85.42 180 bottom
T47  test  [TP30]  11.58 96.92 0 top
T48  test  [TP30]  17.07 92.3 0 top
T49  test  [TP30]  11.95 96.21 0 top
T50  test  [TP30]  17.33 95.06 0 top
T52  test  [TP30]  16.58 91.98 0 top
T53  test  [TP30]  16.28 92.52 0 top
T54  test  [TP30]  15.74 94.03 0 top
T55  test  [TP30]  26.89 40.28 0 top
T57  test  [TP30]  24.36 43.06 180 bottom
T58  test  [TP30]  23.7 43.67 180 bottom
T59  test  [TP30]  27.17 39.51 0 top
T60  test  [TP30]  19.81 41.66 180 bottom
T61  test  [TP30]  27.54 82.64 180 bottom
T62  test  [TP30]  27.62 82.08 180 bottom
T63  test  [TP30]  17.06 92.31 180 bottom
T64  test  [TP30]  27.12 81.74 180 bottom
T65  test  [TP30]  27.12 81.23 180 bottom
T66  test  [TP30]  29.12 81.23 180 bottom
T67  test  [TP30]  29.12 81.74 180 bottom
T68  test  [TP30]  28.12 81.23 180 bottom
T69  test  [TP30]  28.12 81.74 180 bottom
T70  test  [TP30]  28.12 82.78 180 bottom
T71  test  [TP30]  28.12 83.3 180 bottom
T72  test  [TP30]  31.44 72.14 0 top
T73  test  [TP30]  31.44 72.68 0 top
T74  test  [TP30]  31.42 73.2 0 top
T75  test  [TP30]  31.42 73.74 0 top
T76  test  [TP30]  32.28 75.33 0 top
T77  test  [TP30]  32.28 73.48 0 top
T78  test  [TP30]  32.3 74 0 top
T79  test  [TP30]  32.28 75.86 0 top
T80  test  [TP30]  30.43 76.06 0 top
T81  test  [TP30]  30.43 76.63 0 top
T82  test  [TP30]  29.5 77.7 0 top
T83  test  [TP30]  29.5 78.31 0 top
T84  test  [TP30]  31.64 77.63 0 top
T85  test  [TP30]  30.5 77.68 0 top
T86  test  [TP30]  30.5 78.28 0 top
T87  test  [TP30]  31.64 78.23 0 top
T112  TX  [TP30]  34.37 18.12 0 top
T113  RX  [TP30]  35.92 18.12 0 top
T116  test  [TP30]  11.45 96.12 0 top
T117  test  [TP30]  19 91.35 180 bottom
T118  test  [TP30]  9.36 99.58 180 bottom
T119  test  [TP30]  10.37 98.89 180 bottom
T120  test  [TP30]  9.78 99.05 180 bottom
T121  test  [TP30]  7.95 99.34 180 bottom
T128  TX  [TP30]  30.77 22.94 180 bottom
T129  RX  [TP30]  29.6 22.92 180 bottom
T130  test  [TP30]  34.21 80.43 180 bottom
T131  test  [TP30]  39.86 53.96 180 bottom
T132  test  [TP30]  38.33 119.52 0 top
T133  test  [TP30]  38.41 121.91 0 top
T134  test  [TP30]  28.27 127.34 180 bottom
T135  test  [TP30]  37.63 128.32 180 bottom
T136  test  [TP30]  37.13 125.44 180 bottom
T137  test  [TP30]  36.59 117.3 0 top
T138  test  [TP30]  29.08 125.62 180 bottom
T139  test  [TP30]  36.66 124.21 0 top
T140  test  [TP30]  39.15 116.31 180 bottom
T141  test  [TP30]  40.97 120.29 180 bottom
T142  test  [TP30]  40.99 117.49 180 bottom
T143  test  [TP30]  40.24 113.72 180 bottom
T144  test  [TP30]  33.45 126.7 180 bottom
T145  test  [TP30]  34.92 125.65 180 bottom
T146  test  [TP30]  36.08 119.62 180 bottom
T147  test  [TP30]  35.39 123.2 180 bottom
T148  test  [TP30]  32.78 124 180 bottom
T149  test  [TP30]  31.53 126.62 180 bottom
T150  test  [TP30]  30.6 129.02 180 bottom
T151  test  [TP30]  30.35 124.27 180 bottom
T152  test  [TP30]  30.11 127.15 180 bottom
T153  test  [TP30]  37.98 127.14 180 bottom
T154  test  [TP30]  38.1 52.2 180 bottom
T155  test  [TP30]  37.16 55.33 180 bottom
T156  test  [TP30]  36.08 53.44 180 bottom
T157  test  [TP30]  35.39 55.12 180 bottom
T158  test  [TP30]  39.09 55.41 180 bottom
T159  test  [TP30]  31.91 56.29 180 bottom
T160  test  [TP30]  33.82 58.13 180 bottom
T161  test  [TP30]  40.99 56.86 180 bottom
T162  test  [TP30]  37.33 57.06 180 bottom
T163  test  [TP30]  39.76 61.33 180 bottom
T164  test  [TP30]  40.55 58.93 180 bottom
T165  test  [TP30]  37.94 57.78 180 bottom
T166  test  [TP30]  37.87 58.99 180 bottom
T167  test  [TP30]  35.85 60.59 180 bottom
T168  test  [TP30]  32.83 67.12 180 bottom
T169  test  [TP30]  31.78 68.03 180 bottom
